# Altium PCB POD-Design-v1.0.PcbDoc (part 5 of 8)
Units mil, origin at the board's own origin, x right, y up, seen from the top; angles counter-clockwise.
Board outline 5511.81 x 3937.01 mil, 4 copper layers (Top Layer, Layer 1, Layer 2, Bottom Layer), stack 61.653 mil thick; 347 components, 252 nets, 1015 pads, 412 vias.
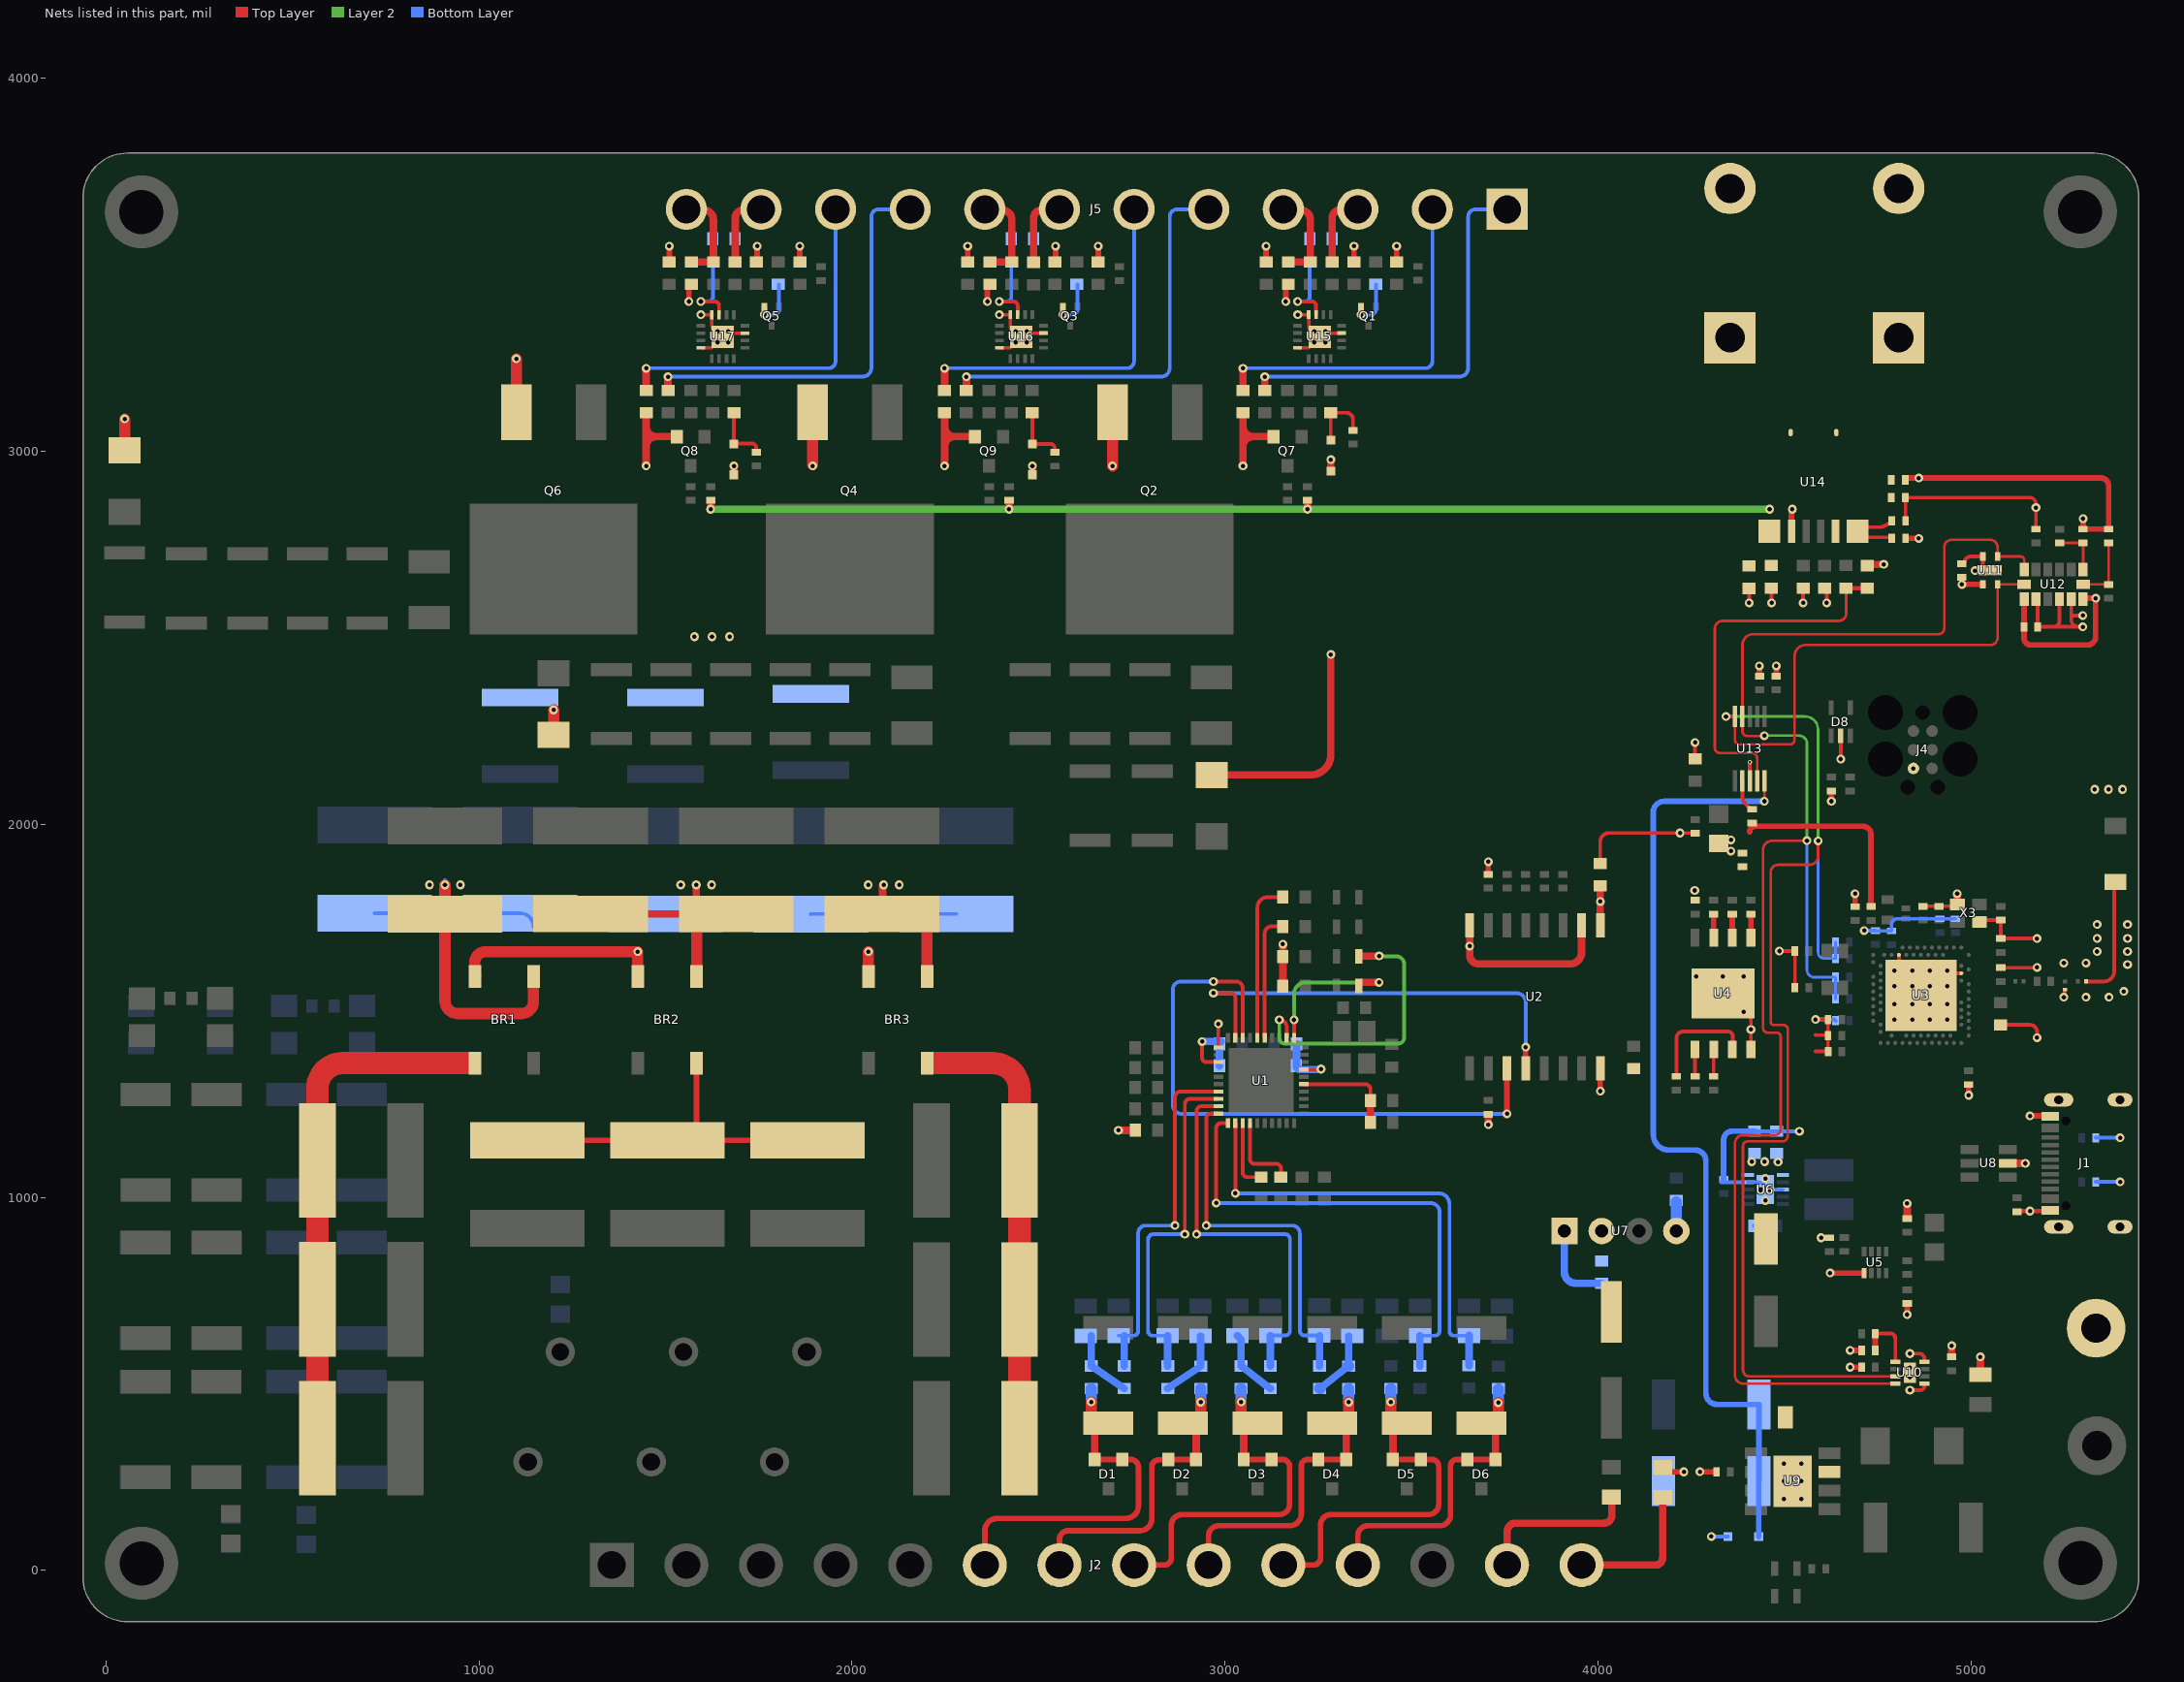
[diagram p4: the nets of this part, all layers, seen from the top]

## Part data (continued)
R110 R111 R112 R127 R128 R129 R144 R145 R146: library part CRCW201010K5FKEF, "RES SMD 10.5K OHM 1% 3/4W 2010", LCSC Part Number=C3009756, Manufacturer="Vishay Dale", Voltage Rating (DC)=400V, ComponentLink1Description=https://datasheet.ciiva.com/48526/dcrcwe3-48526619.pdf?src-supplier=Avnet, ComponentLink1URL=https://datasheet.ciiva.com/48526/dcrcwe3-48526619.pdf?src-supplier=Avnet, ComponentLink2Description=https://datasheet.ciiva.com/2476/dcrcwe3-2476773.pdf?src-supplier=Digikey, ComponentLink2URL=https://datasheet.ciiva.com/2476/dcrcwe3-2476773.pdf?src-supplier=Digikey, ComponentLink3Description=https://datasheet.ciiva.com/2476/dcrcwe3-2476774.pdf?src-supplier=Digikey, ComponentLink3URL=https://datasheet.ciiva.com/2476/dcrcwe3-2476774.pdf?src-supplier=Digikey, ComponentLink4Description=https://datasheet.ciiva.com/2476/dcrcwe3-2476775.pdf?src-supplier=Digikey, ComponentLink4URL=https://datasheet.ciiva.com/2476/dcrcwe3-2476775.pdf?src-supplier=Digikey, Item Type=Resistors, Lead Free=5697LeadFree, Manufacturer Part Number=CRCW201010K5FKEF, Pricing="1=0.22, 10=0.103, 50=0.103, 100=0.067, 1000=0.049, 10000=0.028 (USD)", RoHS=Yes, Stock=2385, Supplier=Mouser
R113 R114 R130 R131 R147 R148: library part AS101AJ0105T4E, "1.5W Thick Film Resistors 400V ±100ppm/℃ ±5% 1MΩ 2010 Chip Resistor - Surface Mount ROHS", LCSC Part Number=C965991, Manufacturer="UNI-ROYAL(Uniroyal Elec)", Package=2010, ComponentLink1Description=LCSC, ComponentLink1URL=https://www.lcsc.com/product-detail/Chip-Resistor-Surface-Mount_UNI-ROYAL-Uniroyal-Elec-AS101AJ0105T4E_C965991.html, Item Type=Resistor, Manufacturer Part Number=AS101AJ0105T4E
R149 R150 R151: library part RC0603FR-07499RL, "RES 499 OHM 1% 1/10W 0603", Case Code (Imperial)=0603, Case Code (Metric)=1608, LCSC Part Number=C137714, Manufacturer=Yageo, Max Operating Temperature=155°C, Max Power Dissipation=100mW, Min Operating Temperature=-55°C, Package Quantity=1, Resistor Type="Thick Film", Supplier Part Number 1=1995585, Temperature Coefficient=100ppm/°C, Tolerance=1%, Voltage Rating=50V, Case/Package=0603, Category="Chip SMD Resistors", ComponentLink1Description=https://datasheet.ciiva.com/11808/0900766b80f96399-11808558.pdf?src-supplier=RSComponents, ComponentLink1URL=https://datasheet.ciiva.com/11808/0900766b80f96399-11808558.pdf?src-supplier=RSComponents, ComponentLink2Description=https://datasheet.ciiva.com/2453/pyu-r-int-thick-7-2453956.pdf?src-supplier=Digi-Key, ComponentLink2URL=https://datasheet.ciiva.com/2453/pyu-r-int-thick-7-2453956.pdf?src-supplier=Digi-Key, ComponentLink3Description=https://datasheet.ciiva.com/2453/pyu-r-int-thick-7-2453957.pdf?src-supplier=Digi-Key, ComponentLink3URL=https://datasheet.ciiva.com/2453/pyu-r-int-thick-7-2453957.pdf?src-supplier=Digi-Key, ComponentLink4Description=https://datasheet.ciiva.com/2453/pyu-r-int-thick-7-2453955.pdf?src-supplier=Digi-Key, ComponentLink4URL=https://datasheet.ciiva.com/2453/pyu-r-int-thick-7-2453955.pdf?src-supplier=Digi-Key, ComponentLink5Description=https://datasheet.ciiva.com/12558/rc0603-272842-12558391.pdf?src-supplier=Mouser, ComponentLink5URL=https://datasheet.ciiva.com/12558/rc0603-272842-12558391.pdf?src-supplier=Mouser, ComponentLink6Description=https://datasheet.ciiva.com/8885/pyu-rc0603-51-rohs-l-4-8885483.pdf?src-supplier=Avnet, ComponentLink6URL=https://datasheet.ciiva.com/8885/pyu-rc0603-51-rohs-l-4-8885483.pdf?src-supplier=Avnet, Construction=Rectangular, Contact Plating=Tin,Matte, Depth=0.8mm, Features="Moisture Resistant", Height=0.45mm, Lead Free="Lead Free", Length=1.6mm, Manufacturer Part Number=RC0603FR-07499RL, Military Standard=Not, Mount="Surface Mount", Number of Terminations=2, Packaging="Tape and Reel", Power Rating=100mW, Pricing 1="5000=0.00300, 10000=0.00300, 15000=0.00300, 20000=0.00200 (GBP)", Radiation Hardening=No, Resistance=499R, RoHS=Yes, RoHS Compliant=Yes, Series=RC, Size Code=0603, Stock 1=900, Supplier 1=RSComponents, Technology="THICK FILM", Termination=SMD/SMT, Voltage Rating (DC)=50V, Width=0.031inch
RV1 RV2 RV3: "775V 385V 300V 470V Plugin Varistors ROHS", LCSC Part Number=C522648, Manufacturer=Yageo, Item Type=Varistors, Manufacturer Part Number=471KD10J, Pricing="1=0.43, 10=0.27, 50=0.27, 100=0.187, 1000=0.145, 10000=0.096 (USD)", RoHS=Yes, Stock=1519, Supplier=Mouser
SB1: "Solder Bridge ON", Manufacturer Part Number="Solder Bridge", Item Type="Solder Bridge"
TP1 TP2: "Test pad"
U1: "IC AFE 7 CHAN 40LFCSP-WQ", Manufacturer="Analog Devices", Supplier Part Number=584-ADE9000ACPZ, ComponentLink1Description=http://www.farnell.com/datasheets/2280571.pdf?src-supplier=Farnell, ComponentLink1URL=http://www.farnell.com/datasheets/2280571.pdf?src-supplier=Farnell, ComponentLink2Description=https://datasheet.octopart.com/ADE9000ACPZ-Analog-Devices-datasheet-165826959.pdf?src-supplier=Element14, ComponentLink2URL=https://datasheet.octopart.com/ADE9000ACPZ-Analog-Devices-datasheet-165826959.pdf?src-supplier=Element14, ComponentLink3Description=https://www.analog.com/media/en/technical-documentation/data-sheets/ADE9000.pdf?src-supplier=Digikey, ComponentLink3URL=https://www.analog.com/media/en/technical-documentation/data-sheets/ADE9000.pdf?src-supplier=Digikey, Item Type=IC, Manufacturer Part Number=ADE9000ACPZ, Pricing="1=18.44, 10=13.35, 50=10.79, 100=10.79, 1000=10.52, 10000=10.52 (USD)", RoHS=Yes, Stock=7889, Supplier=Mouser
U2: "DGTL ISO 5000VRMS 4CH GP 16SOIC", Case/Package=SOIC, Isolated Power=No, LCSC Part Number=C571196, Manufacturer="Texas Instruments", Max Operating Temperature=125°C, Min Operating Temperature=-55°C, Channel Type=Unidirectional, ComponentLink1Description=http://www.ti.com/lit/ds/symlink/iso7741.pdf?src-supplier=Digikey, ComponentLink1URL=http://www.ti.com/lit/ds/symlink/iso7741.pdf?src-supplier=Digikey, ComponentLink2Description=http://www.ti.com/general/docs/suppproductinfo.tsp?distId=10&amp;gotoUrl=http%3A%2F%2Fwww.ti.com%2Flit%2Fgpn%2Fiso7741&src-supplier=Digikey, ComponentLink2URL=http://www.ti.com/general/docs/suppproductinfo.tsp?distId=10&amp;gotoUrl=http%3A%2F%2Fwww.ti.com%2Flit%2Fgpn%2Fiso7741&src-supplier=Digikey, Data Rate=100Mbps, Item Type=IC, Lead Free="Lead Free", Manufacturer Part Number=ISO7741DWR, Mounting Technology="Surface Mount", Number of Channels=4, Packaging="Cut Tape", Pins=16, Pricing="1=2.32, 10=1.36, 50=1.36, 100=1.29, 1000=1.22, 10000=1.1 (USD)", Propagation Delay=16ns, Pulse Width Distortion (PWD)=4.9ns, RoHS=Yes, RoHS Compliant=Yes, Series=-, Stock=8750, Supplier=Mouser, Type="General Purpose"
U3: "IC RF TXRX+MCU 802.15.4 73QFN", Clock Frequency=2.4GHz, LCSC Part Number=C190794, Manufacturer="Nordic Semiconductor", Max Supply Voltage=5.5V, Min Supply Voltage=1.7V, ComponentLink1Description=https://datasheet.ciiva.com/67714/nrf52840-ps-v1-1-67714656.pdf?src-supplier=Digikey, ComponentLink1URL=https://datasheet.ciiva.com/67714/nrf52840-ps-v1-1-67714656.pdf?src-supplier=Digikey, Height=850um, Item Type=IC, Manufacturer Part Number=NRF52840-QIAA-R, Pricing="3000=3.3173, 6000=3.30038, 12000=3.28345, 18000=3.26653, 24000=3.2496 (USD)", RoHS=No, Stock=42000, Supplier=Avnet
U4: "IC FLASH 128MBIT SPI/QUAD 8WSON", Frequency=133MHz, LCSC Part Number=C401662, Manufacturer=Winbond, Max Operating Temperature=85°C, Min Operating Temperature=-40°C, ComponentLink1Description=http://www.winbond.com/resource-files/w25q128jv%20revf%2003272018%20plus.pdf?src-supplier=Digikey, ComponentLink1URL=http://www.winbond.com/resource-files/w25q128jv%20revf%2003272018%20plus.pdf?src-supplier=Digikey, Item Type=IC, Manufacturer Part Number=W25Q128JVEIQ, Memory Format=Non-Volatile,FLASH, Memory Size=128Mb, Mounting Technology="Surface Mount", Packaging=Rail/Tube, Pricing="1=1.92, 10=1.701, 25=1.6224, 63=1.54651, 126=1.49183, 252=1.43909, 504=1.38821, 1008=1.33908, 5040=1.23141 (USD)", RoHS=Yes, RoHS Compliant=Yes, Series=SpiFlash®, Stock=12733, Supplier=Digikey
U5: "1.6-V TO 5.5-V, 20-M, 4-A LOW IQ", Manufacturer="Texas Instruments", Supplier Part Number=595-TPS2117DRLR, Height=600um, Item Type=IC, Length=2.1mm, Manufacturer Part Number=TPS2117DRLR, Pins=8, Pricing="1=1.34, 10=1.2, 50=1.2, 100=0.938, 1000=0.612, 10000=0.522 (USD)", RoHS=No, Stock=3415, Supplier=Mouser, Thickness=550um, Width=1.2mm
U6: "IC REG BUCK BST 3.3V 900MA 10SON", LCSC Part Number=C15516, Manufacturer="Texas Instruments", ComponentLink1Description=https://datasheet.ciiva.com/2034/tps63030-2034702.pdf?src-supplier=Digikey, ComponentLink1URL=https://datasheet.ciiva.com/2034/tps63030-2034702.pdf?src-supplier=Digikey, ComponentLink2Description=https://datasheet.ciiva.com/3221/tps63030-3221513.pdf?src-supplier=Avnet, ComponentLink2URL=https://datasheet.ciiva.com/3221/tps63030-3221513.pdf?src-supplier=Avnet, Item Type=IC, Manufacturer Part Number=TPS63031DSKR, Pricing="1=2.33, 10=1.64, 50=1.64, 100=1.35, 1000=0.965, 10000=0.917 (USD)", RoHS=Yes, Stock=43441, Supplier=Mouser
U7: "Plugin Isolated Power Modules ROHS", LCSC Part Number=C2992399, Manufacturer=YLPTEC, Package=Plugin, ComponentLink1Description=LCSC, ComponentLink1URL=https://www.lcsc.com/product-detail/Isolated-Power-Modules_YLPTEC-B0303S-1WR2_C2992399.html, Item Type="Power Module", Manufacturer Part Number=B0303S-1WR2
U8: "6A 12V 150W 6V Unidirectional 5V SOT-23-6 ESD and Surge Protection (TVS/ESD) ROHS", LCSC Part Number=C2827654, Manufacturer="TECH PUBLIC", Package=SOT-23-6, ComponentLink1Description=LCSC, ComponentLink1URL=https://www.lcsc.com/product-detail/ESD-and-Surge-Protection-TVS-ESD_TECH-PUBLIC-USBLC6-2SC6_C2827654.html, Item Type=(TVS/ESD), Manufacturer Part Number=USBLC6-2SC6
U9: "4V~6V Polymer 1 3.5A SOP-8-EP Battery Management ICs ROHS", LCSC Part Number=C130316, Manufacturer=SOLA-IC, Package=SOP-8-EP, ComponentLink1Description=LCSC, ComponentLink1URL=https://www.lcsc.com/product-detail/Battery-Management-ICs_SOLA-IC-SLM6600_C130316.html, Item Type=IC, Manufacturer Part Number=SLM6600
U10: "IC BATT MON LI-ION 1CELL 8TDFN", LCSC Part Number=C2682616, Manufacturer=Maxim, Max Operating Temperature=85°C, Min Operating Temperature=-20°C, Operating Supply Current=23uA, Operating Supply Voltage=4.5V, Output Voltage=400mV, Package Quantity=10000, Supplier Part Number 1=700-MAX17048G+T10, Category="Battery Management", ComponentLink1Description=https://datasheet.ciiva.com/14083/max17048-max17049-14083973.pdf?src-supplier=Digi-Key, ComponentLink1URL=https://datasheet.ciiva.com/14083/max17048-max17049-14083973.pdf?src-supplier=Digi-Key, Contact Plating=Tin,Matte, Item Type=IC, Manufacturer Part Number=MAX17048G+T10, Mount="Surface Mount", Number of Pins=8, Packaging="Tape and Reel", Pricing 1="1=3.34000, 10=3.00000, 50=2.84000, 100=2.46000, 1000=1.89000, 10000=1.83000 (USD)", Radiation Hardening=No, RoHS=Yes, RoHS Compliant=Yes, Series=ModelGauge™, Stock 1=41293, Supplier 1=Mouser
U11: "SHTC3 Series Digital ±2% RH SMT Humidity Temperature Sensor - DFN-8", LCSC Part Number=C194656, Manufacturer=Sensirion, ComponentLink1Description=https://datasheet.octopart.com/SHTC3-TR-2.5KS-Sensirion-datasheet-166628637.pdf?src-supplier=Future+Electronics, ComponentLink1URL=https://datasheet.octopart.com/SHTC3-TR-2.5KS-Sensirion-datasheet-166628637.pdf?src-supplier=Future+Electronics, Item Type=IC, Manufacturer Part Number=SHTC3-TR-2.5KS, Pricing="1=2.72, 5=2.292, 10=2.129, 25=1.932, 50=1.7952, 100=1.6682, 500=1.40712, 1000=1.30776 (USD)", RoHS=No, Stock=21685, Supplier=Digikey
U12: "ACCEL 2-16G I2C/SPI 14LGA", LCSC Part Number=C9667, Manufacturer="Analog Devices", ComponentLink1Description=https://datasheet.ciiva.com/15099/getdatasheetpartid-317342-15099703.pdf?src-supplier=Verical, ComponentLink1URL=https://datasheet.ciiva.com/15099/getdatasheetpartid-317342-15099703.pdf?src-supplier=Verical, ComponentLink2Description=https://datasheet.ciiva.com/3271/adxl345-ep-3271528.pdf?src-supplier=Avnet, ComponentLink2URL=https://datasheet.ciiva.com/3271/adxl345-ep-3271528.pdf?src-supplier=Avnet, ComponentLink3Description=https://datasheet.ciiva.com/2809/adxl345-2809853.pdf?src-supplier=Digikey, ComponentLink3URL=https://datasheet.ciiva.com/2809/adxl345-2809853.pdf?src-supplier=Digikey, ComponentLink4Description=https://datasheet.ciiva.com/2809/adxl345-2809854.pdf?src-supplier=Digikey, ComponentLink4URL=https://datasheet.ciiva.com/2809/adxl345-2809854.pdf?src-supplier=Digikey, ComponentLink5Description=https://datasheet.ciiva.com/2809/adxl345-2809855.pdf?src-supplier=Digikey, ComponentLink5URL=https://datasheet.ciiva.com/2809/adxl345-2809855.pdf?src-supplier=Digikey, ComponentLink6Description=https://datasheet.ciiva.com/3271/adxl345-ep-3271595.pdf?src-supplier=Avnet, ComponentLink6URL=https://datasheet.ciiva.com/3271/adxl345-ep-3271595.pdf?src-supplier=Avnet, Item Type=Accelerometers, Manufacturer Part Number=ADXL345BCCZ-RL7, Pricing="1=6.67, 10=5.76, 50=5.27, 100=5.09, 1000=4.59, 10000=4.59 (USD)", RoHS=Yes, Stock=17836, Supplier=Mouser
U13: "IC ADC 16BIT SIGMA-DELTA 10VSSOP", Case/Package=VSSOP, LCSC Part Number=C37593, Manufacturer="Texas Instruments", Max Operating Temperature=125°C, Max Supply Voltage=5.5V, Min Operating Temperature=-40°C, Min Supply Voltage=2V, Nominal Supply Current=150uA, Package Quantity=2500, Power Dissipation=900uW, Supplier Part Number=595-ADS1115IDGSR, Category="Analog to Digital Converters (ADCs)", ComponentLink1Description=https://datasheet.ciiva.com/4031/47725463s8438921n7713-4031028.pdf?src-supplier=Arrow+Electronics, ComponentLink1URL=https://datasheet.ciiva.com/4031/47725463s8438921n7713-4031028.pdf?src-supplier=Arrow+Electronics, Contact Plating=Gold, Conversion Rate=0.86KS/s, Height=1.07mm, Integral Nonlinearity (INL)=1LSB, Interface=I2C, Item Type=IC, Lead Free="Lead Free", Length=3mm, Manufacturer Part Number=ADS1115IDGSR, Max Supply Voltage (DC)=5.5V, Min Supply Voltage (DC)=2V, Number of A/D Converters=1, Number of Bits=16, Number of Channels=2, Number of Converters=1, Number of Inputs=4, Packaging="Tape and Reel", Pins=10, Polarity=Bipolar, Pricing="1=5.44, 10=4.76, 50=4.76, 100=4.01, 1000=2.88, 10000=2.78 (USD)", Reach SVHC Compliant=No, Resolution=16b, RoHS=Yes, RoHS Compliant=Yes, Sampling Rate=860S/s, Series=-, Stock=5925, Supplier=Mouser, Supply Type=Single, Thickness=1.02mm, Width=3mm
U14: "POSITION&CURRENT SENSORS", LCSC Part Number=C540236, Manufacturer=Infineon, Max Supply Voltage=3.5V, Min Supply Voltage=3.1V, Operating Supply Current=15mA, Accuracy=2.25%, Height=1.1mm, Item Type="Current Sensors", Manufacturer Part Number=TLI4971-A120T5-U-E0001, Pricing="2500=2.753 (USD)", RoHS=Yes, Sensing Method=6244SensingMethod, Stock=5000, Supplier="Arrow Electronics"
U15 U16 U17: "IC GRND FAULT CIRC INTER 16-VQFN", LCSC Part Number=C17533396, Manufacturer="Texas Instruments", Item Type=IC, Manufacturer Part Number=AFE3010AIRGTR, Pricing="1=1.66, 10=1.61, 50=1.61, 100=1.61, 1000=1.23, 10000=0.749 (USD)", RoHS=Yes, Stock=1960, Supplier=Mouser
X1: library part X322524576MOB4SI, "24.576MHz Surface Mount Crystal 12pF ±10ppm ±20ppm SMD3225-4P Crystals ROHS", LCSC Part Number=C70568, Manufacturer=YXC, ComponentLink1Description=LCSC, ComponentLink1URL=https://www.lcsc.com/product-detail/Crystals_YXC-Crystal-Oscillators-X322524576MOB4SI_C70568.html?s_z=n_X322524576MOB4SI, Item Type=Crystal, Manufacturer Part Number=X322524576MOB4SI, RoHS=No, Supplier=LCSC
X2: library part Q13FC13500049, "Crystal, 32.768KHZ, 6PF, 3.2MM X 1.5MM Rohs Compliant: Yes", LCSC Part Number=C95361, Manufacturer=Epson, Item Type=Crystal, Manufacturer Part Number=Q13FC13500049, Pricing="100=5.52, 250=5.41 (DKK)", RoHS=No, Stock=760, Supplier=Farnell
X3: library part Q22FA12800025, "CRYSTAL 32.0000MHZ 8PF SMD", LCSC Part Number=C187794, Manufacturer=Epson, ComponentLink1Description=http://ndap3-net.ebz.epson.co.jp/w/www/PDFS/epdoc_qd.nsf/85a4e2c523a1f89349257068002f9e30/255cb2884010a1f9492571f0004c7d72/$FILE/FA-128_E09X.pdf?src-supplier=Newark, ComponentLink1URL=http://ndap3-net.ebz.epson.co.jp/w/www/PDFS/epdoc_qd.nsf/85a4e2c523a1f89349257068002f9e30/255cb2884010a1f9492571f0004c7d72/$FILE/FA-128_E09X.pdf?src-supplier=Newark, ComponentLink2Description=http://www.farnell.com/datasheets/1734615.pdf?src-supplier=Newark, ComponentLink2URL=http://www.farnell.com/datasheets/1734615.pdf?src-supplier=Newark, Item Type=Crystal, Manufacturer Part Number=Q22FA12800025, Pricing="250=0.511 (GBP)", RoHS=Yes, Stock=250, Supplier=Farnell

## Free pads (board coordinates)
  round 196.85 hole 118.11: MH(95.31,3641.74) MH(95.67,19.32) MH(5292.52,3642.09) MH(5292.88,19.68)

## Via types
v1: diameter 23.62, hole 11.81, Top Layer to Bottom Layer, tented both sides, 381 vias
v2: diameter 11.81, hole 5.91, Top Layer to Bottom Layer, tented both sides, 30 vias
v3: diameter 15.75, hole 5.91, Top Layer to Bottom Layer, tented both sides, 1 vias

## Nets (pads, with @x,y where several pads share a name; then routed paths per layer and width w, separated by ;. In a path a pad name is that pad's centre, name@x,y a point inside that pad or via, vN(x,y) a via of type N, cw(c..) or ccw(c..) an arc to the next point about the centre after c; other vN are vias at no path point)
3V3: C15.2 C57.2 C58.2 C61.2 C67.2 C68.1 C71.2 C73.2 C74.2 FB6.2 R21.1 R54.1 R67.2 R76.1 R78.2 R79.2 R82.2 R89.1 R90.1 R155.1 R157.1 R159.1 U2.1 U6.1 U6.10 U7.2 U11.1 U12.1 U12.6 U14.1 | length 4970
  Top Layer w15: R21.1@3705.93,1865.94 v1(3705.93,1900) ; 4406.71,1980 cw(c4421.64,1980) 4421.64,1994.93 4709.9,1994.93 cw(c4709.9,1973.17) 4731.66,1973.17 R54.1@4731.66,1779.82 ; v1(4597.95,891.9) R67.2@4620.63,891.91 ; v1(4676,590) R76.1@4706.38,590 ; R90.1@4823.42,2928.65 v1(4859.92,2928.65) ; R89.1@4824.42,2766.69 v1(4859.96,2766.69) ; v1@4860.6,2928.65 5347.79,2928.65 cw(c5347.79,2907.63) 5368.81,2907.63 R79.2@5368.81,2791.64 R78.2@5300.39,2791.64 v1@5300.39,2819.56 ; C67.2@4975.32,2662.25 v1(4975.32,2643.35) U11.1@5031.63,2643.35 ; U12.1@5141.74,2602.8 C68.1@5141.74,2529.64 5141.74,2500.26 ccw(c5161,2500.26) 5161,2481 5311.7,2481 ccw(c5311.7,2503.33) 5334.03,2503.33 v1(5334.03,2606.35) ; U12.6@5300,2603.58 5302.76,2606.35 v1@5333.82,2606.35
  Top Layer w20: v1(1621,2845) 1621.08,2845 R157.1@1621.08,2866.09 ; v1(2421.08,2845) R159.1@2421.08,2865.12 ; v1@3221.08,2845 R155.1@3221.08,2865.8 ; U2.1@4005.93,1729.37 v1(4005.93,1793.48) C15.2@4005.93,1835.44
  Layer 2 w20: v1(1621,2845) v1(2421.08,2845) v1(3220.96,2845) v1(4459.96,2845)
  other v1: 4482.77,1094.86 4412.27,1096.06 4446.77,1096.06 4356.06,1928.61 4356.06,1958.61 5300.35,2819.56
3V3-IS: C16.2 C24.2 C25.2 C62.2 R22.2 R23.1 R28.2 R29.2 U1.1 U1.27 U2.16 U7.4 | length 563.2
  Top Layer w10: U1.1@2982.03,1402.08 v1(2982.03,1465.59) ; U1.27@3210.97,1343.03 v1@3257.25,1343.03 ; v1@4005,1285 ccw(c4005,1285.93) v1@4005.93,1285.93
  Top Layer w15: v1@4005.93,1285.93 U2.16@4005.93,1345.51
  Top Layer w20: v1(2714.35,1180) R23.1@2760,1180 ; R28.2@3155.19,1566.75 R29.2@3155.19,1646.16 v1(3155.19,1679.19) ; v1(3705.93,1195) R22.2@3705.93,1220.5
  Bottom Layer w20: C25.2@3191.71,1411.9 3191.71,1353.05 C24.2@3191.36,1352.71 ccw(c3201.04,1352.71) 3201.04,1343.03 v1@3257.25,1343.03
  Bottom Layer w30: U7.4@4210,910 C62.2@4210,988.05
  other v1: 4005.93,1285 3257.25,1344.2
ACCEL_CS: R64.2 R79.1 U12.7 | length 179.7
  Top Layer w7: U12.7@5300.39,2643.35 R64.2@5368.81,2643.35 R79.1@5368.81,2754.64
ACCEL_INT: R63.2 R78.1 U12.8 | length 134.8
  Top Layer w7: R63.2@5237.75,2754.44 5237.75,2754.64 R78.1@5300.39,2754.64 5300.39,2683.11 U12.8@5300,2683.11
ALARM-1: D12.2 R92.2 R108.1 | length 172.1
  Top Layer w10: R108.1@3283.48,3103.47 R108.1@3283.48,3103.47 ; D12.2@3283.54,3029.95 R108.1@3283.48,3103.47 ; R92.2@3343,3056.62 3343,3085.27 ccw(c3324.8,3085.27) 3324.8,3103.47 R108.1@3283.48,3103.47
ALARM-2: D14.2 R93.2 R125.1 | length 152.1
  Top Layer w10: R125.1@2483.48,3103.47 R125.1@2483.48,3103.47 D14.2@2483.54,3029.95 ; D14.2@2483.54,3019.95 2532.3,3019.95 cw(c2532.3,3009.26) 2542.97,3010.01 ; 2543,3009.26 ccw(c2532.3,3009.26) 2542.97,3010.01 ; R93.2@2543.71,2997.51 cw(c2543.71,2998.25) 2542.97,2998.25 2542.97,3010.01
ALARM-3: D13.2 R94.2 R142.1 | length 162
  Top Layer w10: R142.1@1683.48,3103.47 1683.54,3020.8 1732.3,3020.8 cw(c1732.3,3010.1) 1743,3010.1 R94.2@1743,2996.32
ALRT_RDY: R82.1 U13.2 | length 87.1
  Top Layer w10: U13.2@4387.02,2116.14 4387.02,2076.84 ccw(c4421.17,2076.84) 4397,2052.72 4405.03,2044.69 4409.02,2044.69 R82.1@4413.02,2040.69
AVDD1: C20.2 C21.2 U1.25 | length 276
  Top Layer w10: U1.25@3210.97,1303.66 3375.82,1303.66 cw(c3375.82,1289.49) 3390,1289.49 C20.2@3390,1260
  Top Layer w20: C21.2@3389.99,1200.65 C20.2@3390,1260
BAT_ALERT: R62.2 R76.2 U10.5 | length 168.8
  Top Layer w10: R62.2@4743.38,635 4743.38,635.46 4783.23,635.46 cw(c4783.23,621.65) 4797.05,621.65 U10.5@4797.05,559.83
  Top Layer w15: R76.2@4743.38,590 R62.2@4743.38,635
CF3_1: R26.2 U1.35 | length 339.4
  Top Layer w10: U1.35@3106.34,1427.97 3106.34,1707.67 cw(c3125.41,1707.67) 3125.41,1726.75 R26.2@3155.19,1726.75
CF4_1: R27.2 U1.36 | length 433.4
  Top Layer w10: U1.36@3086.66,1427.97 3086.66,1776.66 cw(c3115,1776.66) 3115,1805 R27.2@3155.19,1804.99
DC_CUR: C76.2 R88.1 U13.4 | length 1009.1
  Top Layer w7: U13.4@4426.39,2116.14 4426.39,2177.36 ccw(c4412.61,2177.36) 4412.61,2191.14 4327.86,2191.14 cw(c4327.86,2206) 4313,2206 4313,2523.82 cw(c4334.75,2523.82) 4334.75,2545.56 4644.91,2545.56 ccw(c4644.91,2566.01) 4665.36,2566.01 R88.1@4665.36,2633.57
  Top Layer w12: R88.1@4665.36,2633.57 4668.17,2633.57 C76.2@4721.68,2633.57
DC_CUR_NEG: J8.1 U14.7
DC_CUR_POS: J7.1 U14.8
DC_OCD1: C78.2 R89.2 U14.6 | length 200.3
  Top Layer w10: 4753.09,2796.86 4720.23,2796.86 U14.6@4695.7,2785.6 ccw(c4711.6,2785.6) 4711.6,2769.69 R89.2@4786.42,2769.69 ; 4753.13,2796.86 ccw(c4753.13,2834.16) 4776.05,2804.73 4782.42,2809.68 C78.2@4786.08,2816.67
DC_OCD2: C79.2 R90.2 U14.5
DC_VOLTS: D7.2 R85.1 R86.2 U13.5 | length 2549.6
  Top Layer w7: v1@4445,2062 ccw(c4445,2063.08) 4446.08,2063.08 U13.5@4446.08,2116.14
  Bottom Layer w15: D7.2@4430.63,91.22 R86.2@4430.63,239.22 ; R86.2@4431.27,240.07 R85.1@4431.27,445.13 4319.75,445.13 cw(c4319.75,475.88) 4289,475.88 4289,1098.21 ccw(c4260,1098.21) 4260,1127.21 4189.79,1127.21 cw(c4189.79,1169) 4148,1169 4148,2032 cw(c4178,2032) 4178,2062 v1(4446.08,2062)
DC_VOLTS_NEG: J2.14 R87.1 | length 390.3
  Top Layer w20: J2.14@3956.1,14.82 4154.05,14.82 ccw(c4154.05,34) 4173.23,34 R87.1@4173.23,196.22
DC_VOLTS_POS: J2.13 R84.1 | length 445
  Top Layer w20: J2.13@3756.1,14.82 3756.1,103.73 cw(c3779.37,103.73) 3779.37,127 4016.37,127 ccw(c4016.37,147.63) 4037,147.63 4037,195.28 ccw(c4035.43,195.28) R84.1@4035.43,196.85
DVDD1: C18.2 C19.2 U1.3 | length 209.2
  Top Layer w10: v1(2938.72,1417.88) 2938.72,1373.83 ccw(c2949.84,1373.83) 2949.84,1362.71 U1.3@2982.03,1362.71
  Bottom Layer w20: v1(2938.72,1417.88) C19.2@2989.24,1417.88 ; C19.2@2981.24,1407.88 ccw(c2981.24,1411.77) C19.2@2985.12,1411.58 ; C18.2@2985.12,1352.72 C19.2@2985.12,1411.58 ; C19.2@2985.12,1411.77 cw(c2981.24,1411.77) C19.2@2985.12,1411.58
FLASH_CLK: R49.2 U4.6 | length 63.5
  Top Layer w15: U4.6@4359.99,1696.16 R49.2@4359.99,1759.64
FLASH_CS: R48.2 U4.1 | length 72.3
  Top Layer w10: R48.2@4260,1324.64 U4.1@4259.99,1396.95
FLASH_QSPI0: R50.2 U4.5 | length 63.5
  Top Layer w15: U4.5@4409.99,1696.16 R50.2@4409.99,1759.64
FLASH_QSPI1: R51.2 U4.2 | length 72.3
  Top Layer w10: R51.2@4309.99,1324.64 U4.2@4309.99,1396.96
FLASH_QSPI2: R52.2 U4.3 | length 306.4
  Top Layer w10: R52.2@4210.01,1324.64 4210.01,1426.17 cw(c4228.54,1426.17) 4228.54,1444.7 4347.9,1444.7 cw(c4347.9,1431.11) 4361.49,1431.11 4361.49,1398.46 cw(c4359.99,1398.46) U4.3@4359.99,1396.96
FLASH_QSPI3: R53.2 U4.7 | length 63.5
  Top Layer w15: U4.7@4309.99,1696.16 R53.2@4309.99,1759.64
GND: BR1.2 BR2.2 BR3.2 C15.1 C35.1 C36.1 C37.2 C38.1 C39.1 C40.1 C41.1 C42.2 C43.1 C44.2 C46.1 C47.1 C48.1 C49.1 C50.1 C51.1 C52.1 C53.1 C54.1 C55.1 C56.2 C57.1 C58.1 C59.1 C60.1 C61.1 C63.2 C64.2 C65.1 C66.1 C67.1 C68.2 C69.1 C70.1 C71.1 C72.2 C73.1 C74.1 C75.1 C76.1 C77.1 C78.1 C79.1 C81.1 C82.1 C84.1 C86.1 C87.1 C88.1 C90.1 C91.1 C93.1 C95.1 C96.1 C97.1 C99.1 C100.1 C102.1 C104.1 C105.1 C106.1 C107.2 C108.2 C109.2 D7.1 D8.2 D12.1 D13.1 D14.1 J1.A1/B12 J1.B1/A12 J1.S1 J1.S2 J1.S3 J1.S4 J4.5 L5.1 Q1.2 Q2.3 Q3.2 Q4.3 Q5.2 Q6.3 Q7.2 Q8.2 Q9.2 R69.1 R70.1 R71.2 R72.2 R75.1 R77.1 R80.1 R81.1 R83.1 R86.1 R87.2 R107.1 R124.1 R141.1 TP2.1 U2.2 U2.8 U3.74 U3.B7 U3.F23 U4.4 U4.9 U5.1 U6.3 U6.9 U6.11 U7.1 U8.2 U9.7 U9.9 U10.1 U10.4 U10.9 U11.4 U11.5 U12.2 U12.4 U12.5 U13.3 U14.2 U15.4 U15.11 U15.16 U15.17 U16.4 U16.11 U16.16 U16.17 U17.4 U17.11 U17.16 U17.17 X3.2 X3.4 | length 9792.3
  Top Layer w6: U3.F23@4973.76,1601.08 U3.F23@4973.88,1601.2
  Top Layer w9: U17.4@1594.88,3277.51 U17.17@1624.5,3277.51 ; U17.16@1624.49,3366.15 1624.49,3336.53 ccw(c1653.93,3336.53) U17.17@1653.93,3307.09 ; U17.11@1712.99,3316.94 U17.17@1663.78,3316.94 ; U16.4@2394.88,3277.51 2424.5,3277.51 ; U16.16@2424.49,3366.15 2424.49,3336.53 ccw(c2453.93,3336.53) U16.17@2453.93,3307.09 ; U16.11@2512.99,3316.94 U16.17@2463.78,3316.94 ; U15.4@3194.88,3277.51 3224.5,3277.51 ; U15.16@3224.49,3366.15 3224.49,3336.53 ccw(c3253.93,3336.53) U15.17@3253.93,3307.09 ; U15.11@3312.99,3316.94 U15.17@3263.78,3316.94 ; v1@4518.54,2845 v1@4518.63,2845 ; C78.1@4824.42,2814.18 4824.42,2875.16 ccw(c4823.42,2875.16) C79.1@4823.42,2876.16 5156.72,2876.16 cw(c5156.72,2858.87) 5174.02,2858.87 v1(5173.97,2848.94) ; J1.A1/B12@5209.99,963.02 J1.A1/B12@5212.5,965.52 ; J1.B1/A12@5210.5,1215.5 ccw(c5210.5,1217.49) J1.B1/A12@5212.5,1217.49 ; U12.5@5268.5,2603.58 5268.5,2549.13 ccw(c5287.09,2549.13) 5287.09,2530.54 5299.49,2530.54 v1@5300.39,2529.64 ; U17.17@1653.93,3307.09 cw(c1663.78,3307.09) U17.17@1663.78,3316.94 ; U17.17@1653.93,3307.09 U17.17@1663.78,3316.94 ; U16.17@2453.93,3307.09 cw(c2463.78,3307.09) U16.17@2463.78,3316.94 ; U16.17@2453.93,3307.09 U16.17@2463.78,3316.94 ; U15.17@3253.93,3307.09 cw(c3263.78,3307.09) U15.17@3263.78,3316.94 ; U15.17@3253.93,3307.09 U15.17@3263.78,3316.94
  Top Layer w10: C99.1@1562.88,3440.58 C99.1@1569.68,3447.39 ; v1(1594.88,3366.14) U17.16@1624.49,3366.15 ; C90.1@2362.88,3440.58 C90.1@2369.68,3447.39 ; v1(2394.88,3366.14) U16.16@2424.49,3366.15 ; C81.1@3162.88,3440.58 C81.1@3169.68,3447.39 ; v1(3194.88,3366.14) U15.16@3224.49,3366.15 ; C15.1@4005.93,1895.44 4005.93,1953.83 cw(c4029.1,1953.83) 4029.1,1977 v1(4220,1977) 4259.19,1977 C69.1@4260,1976.19 ; R87.2@4173.23,276.22 R87.2@4185.04,264.41 ; C70.1@4260.01,2176.14 v1(4260.01,2219.45) ; v1@4273,264.41 v1(4273,264.92) ; U4.9@4335,1546.57 cw(c4335,1471.58) 4409.99,1471.58 v1(4409.99,1450.15) U4.4@4409.99,1396.95 ; v1(4405,2594) C73.1@4405.01,2632.52 ; U13.3@4406.71,2116.14 v2@4406.71,2166.73 ; R83.1@4432.3,2397.69 R83.1@4433.01,2397.69 ; C74.1@4465.01,2633.62 4465.33,2633.62 v1(4465.33,2594) ; v1@4477.83,2425 v1(4478,2425) ; v1(4486.03,1660.57) C40.1@4528,1660.57 C41.1@4528,1562.14 ; v1(4549.67,2594) C75.1@4549.67,2633.59 ; 4582.57,1436.25 4583.67,1435.15 4615.23,1435.15 C51.1@4616.5,1433.87 ; v1(4583,1477.07) C50.1@4616.5,1477.07 C54.1@4616.5,1391.38 ; 4583.27,1391.38 C54.1@4616.5,1391.38 ; C77.1@4607.98,2633.58 cw(c4607.98,2628.52) 4613.04,2628.52 v1(4613.04,2594) ; C54.1@4616.77,1391.38 C54.1@4616.5,1391.38 ; v1(4650.61,2175.13) D8.2@4650.61,2237.73 ; C76.1@4721.68,2693.57 cw(c4725.11,2693.57) C76.1@4725.11,2697 ; U3.74@4806.56,1629.96 U3.B7@4806.56,1650.41 ; v1(4836.02,483.53) 4863.56,483.53 ccw(c4863.56,494.98) 4875,494.98 U10.1@4875,500.78 ; v1(4836.02,581.5) 4861.22,581.5 cw(c4861.22,567.72) 4875,567.72 U10.4@4875,559.83 ; C35.1@4871.63,1780.63 C47.1@4914,1780.63 X3.2@4963.47,1780.63 ; U3.74@4953.31,1601.08 U3.F23@4973.76,1601.08 ; X3.2@4962.72,1786.49 X3.2@4963.47,1785.74 ; v1(4962.72,1814.39) v1@4962.72,1816.44 ; C67.1@4975.32,2699.25 C67.1@4975.32,2700.05 ; C67.1@4981.78,2700.05 cw(c4999.88,2700.05) 4999.88,2718.15 U11.4@5031.63,2718.15 U11.5@5031.63,2681.37 ; C55.1@4993,1302.5 C55.1@4993.27,1302.23 ; v1@4993.27,1274.34 v1(4993.53,1274.07) ; X3.4@5027.16,1743.63 C46.1@5079.63,1743.63 C42.2@5079.62,1694.01 v1(5176.99,1694.01) ; U11.5@5051.32,2680.25 U11.5@5051.32,2680.75 ; C49.1@5079.61,1462.76 5157.53,1462.76 cw(c5157.53,1443.3) 5176.99,1443.3 v1(5176.99,1428.46) ; C48.1@5079.61,1615.87 5176.99,1615.87 v1(5176.99,1616.45) ; U12.2@5174.02,2603.58 cw(c5174.02,2598.86) 5178.74,2598.86 C68.2@5178.74,2529.64 5221.26,2529.64 ; R80.1@5174.02,2791.64 v1(5173.97,2848.94) ; U12.4@5237.01,2603.58 5237.01,2545.39 cw(c5221.26,2545.39) 5221.26,2529.64 ; v1(5248.61,1536.66) 5250.58,1538.64 5250.58,1557.14 5250.66,1557.22 L5.1@5251.49,1557.22 ; 5270.34,2560 v1(5299.49,2560) ; v1@5300.39,2529.64 v1(5299.49,2529.64) 5221.26,2529.64
  Top Layer w12: C63.2@5122.59,963.02 J1.A1/B12@5209.99,963.02
  Top Layer w15: C102.1@1510.16,3507.4 v1@1510.16,3550.02 ; v1(1562.88,3401.74) C99.1@1562.88,3440.58 ; C108.2@1745.71,3507.38 v1(1745.66,3550) ; v1@1765.07,3364.99 v1(1765.07,3366.14) Q5.2@1765.07,3387.4 ; C105.1@1860,3507.41 v1(1859.96,3550) ; C93.1@2310.16,3507.4 v1@2310.16,3550.02 ; v1(2362.88,3401.74) C90.1@2362.88,3440.58 ; C109.2@2545.71,3507.38 v1(2545.66,3550) ; v1@2565.07,3364.99 v1(2565.07,3366.14) Q3.2@2565.07,3387.4 ; C96.1@2660,3507.4 v1(2659.96,3550) ; C84.1@3110.16,3507.4 v1@3110.16,3550.02 ; v1(3162.88,3401.74) C81.1@3162.88,3440.58 ; C107.2@3345.71,3507.38 v1(3345.66,3550) ; v1@3365.07,3364.99 v1(3365.07,3366.14) Q1.2@3365.07,3387.4 ; C87.1@3460,3507.4 v1(3459.96,3550) ; R87.2@4185.04,264.41 v1(4230,264.41) ; v1@4273,264.41 R75.1@4317.64,264.41 ; R83.1@4432.3,2397.69 v1(4432.3,2425) ; R81.1@4477.83,2397.69 v1@4477.83,2425 ; U14.2@4518.54,2785.6 v1@4518.54,2845 ; v1(4621.87,797.3) U5.1@4712.28,797.3 ; v1(4625.62,2062) C38.1@4625.62,2089.62 ; v1(4676,545.15) R77.1@4706.38,545.15 ; C43.1@4689,1779.5 v1(4689,1814.39) ; v1(4828.82,686) R69.1@4828.82,715.74 ; v1@4993.27,1274.34 C55.1@4993.27,1302.23 ; v1(5158,1218.5) J1.B1/A12@5210.5,1218.5
  Top Layer w20: v1(1448.18,2960.9) 1448.18,3012.66 ; R141.1@1448.18,3102.95 1448.18,3066.63 ; Q8.2@1530.14,3039.64 1475.17,3039.64 ; D13.1@1683.54,2937.28 v1(1683.54,2960.9) ; v1(2248.18,2960.9) 2248.18,3012.66 ; R124.1@2248.18,3102.95 2248.18,3066.63 ; Q9.2@2330.14,3039.64 2275.17,3039.64 ; D14.1@2483.54,2937.28 v1(2483.54,2960.9) ; C88.1@2964.21,2132.58 3229.08,2132.58 ccw(c3229.08,2187.04) 3283.54,2187.04 v1(3283.54,2455.58) ; v1(3048.18,2960.9) 3048.18,3012.66 ; R107.1@3048.18,3102.95 3048.18,3066.63 ; Q7.2@3130.14,3039.64 3075.17,3039.64 ; D12.1@3283.54,2947.28 v1(3283.54,2977.82) ; U2.8@3655.93,1729.37 v1(3655.93,1673.93) 3655.93,1650.42 ccw(c3680.36,1650.42) 3680.36,1626 3925,1626 ccw(c3925,1656.93) 3955.93,1656.93 U2.2@3955.93,1729.37 ; C76.1@4725.11,2697 v1(4766,2697) ; R70.1@4828.83,948.08 v1(4828.83,984) ; C66.1@4948.05,574.7 v1(4948.05,602.5) ; X3.2@4962.72,1786.49 v1(4962.72,1814.39) ; v1(5010.32,2680.25) U11.5@5051.32,2680.25 ; C65.1@5025,525 v1(5025,572.5) ; U8.2@5098.57,1091.5 v1(5145.44,1091.43) ; 1448.18,3012.66 cw(c1475.17,3012.66) 1475.17,3039.64 ; 1448.18,3012.66 1448.18,3066.63 ; 1448.18,3066.63 ccw(c1475.17,3066.63) 1475.17,3039.64 ; 2248.18,3012.66 cw(c2275.17,3012.66) 2275.17,3039.64 ; 2248.18,3012.66 2248.18,3066.63 ; 2248.18,3066.63 ccw(c2275.17,3066.63) 2275.17,3039.64 ; 3048.18,3012.66 cw(c3075.17,3012.66) 3075.17,3039.64 ; 3048.18,3012.66 3048.18,3066.63 ; 3048.18,3066.63 ccw(c3075.17,3066.63) 3075.17,3039.64
  Top Layer w30: C106.1@50,3002.38 v1@50,3086 ; BR1.2@990.61,1594.02 BR1.2@988.87,1592.28 988.87,1630 cw(c1017.87,1630) 1017.87,1659 v1(1425.79,1659) BR2.2@1425.79,1592.28 ; Q6.3@1100,3150 v1(1100,3248.03) ; C97.1@1200,2241.41 v1(1200,2307.06) ; v1@1894.47,2964.84 Q4.3@1894.47,3104.45 ; BR3.2@2043.94,1592.28 v1(2043.94,1659) ; v1(2698.2,2960.9) Q2.3@2698.2,3104.45
  Bottom Layer w9: U6.9@4401.25,1040.91 4428.62,1040.91 cw(c4428.62,1021.22) U6.11@4448.3,1021.22 ; v1(4461.08,1021.22) U6.3@4495.35,1021.22
  Bottom Layer w10: v1(1765.07,3366.14) 1790.29,3366.14 ccw(c1790.29,3380.28) 1804.44,3380.28 C104.1@1804.44,3447.4 ; v1(2565.07,3366.14) 2588.55,3366.14 ccw(c2588.55,3382.03) 2604.44,3382.03 C95.1@2604.44,3447.4 ; v1(3365.07,3366.14) 3390.02,3366.14 ccw(c3390.02,3380.56) 3404.44,3380.56 C86.1@3404.44,3447.4 ; v1(4303.53,91.22) D7.1@4347.95,91.22 ; C60.1@4329.86,1040.91 U6.9@4387.25,1040.91 ; C59.1@4418.3,923.83 cw(c4418.3,915.13) 4427,915.13 4427,829 ; C57.1@4419.68,1177.59 C58.1@4478.68,1177.59 v1(4539.83,1177.59) ; v1(4583,1477.07) 4633.52,1477.07 C52.1@4636.72,1473.88 ; v1(4713.43,1715.2) C36.1@4743.6,1715.2 4743.6,1714.5 C44.2@4786.6,1714.5 ; C44.2@4786.87,1714.5 C44.2@4786.6,1714.5 ; C39.1@4957.97,1747.05 C37.2@4916.57,1747.05 4801.83,1747.05 ccw(c4801.83,1731.82) 4786.6,1731.82 C44.2@4786.6,1714.5 ; R71.2@5334,1041.89 v1(5399.5,1041.89) ; R72.2@5334,1160 v1(5399.5,1160)
  Bottom Layer w15: C60.1@4336.68,1048.09 4336.68,1154.27 cw(c4360,1154.27) 4360,1177.59 C57.1@4419.68,1177.59
  Bottom Layer w20: U7.1@3910,910 3910,800 ccw(c3940,800) 3940,770 C61.1@4010,770
  other v1: 4497.76,192 4545,192 4497.76,239.24 4545,239.24 4497.76,286.49 4545,286.49 4836.18,518.42 4836.18,544 5158,963.53 4448.3,991.69 4436.52,1021.22 4448.3,1050.75 4794.75,1476.28 4841.99,1476.28 4889.24,1476.28 4936.48,1476.28 4390,1497 4794.75,1518.52 4841.99,1518.52 4889.24,1518.52 4936.48,1518.52 5308.14,1536.95 5369.74,1536.95 5409.49,1552.59 4794.75,1565.76 4841.99,1565.76 4889.24,1565.76 4936.48,1565.76 4263,1592.6 4335,1592.6 4390,1592.6 4794.75,1608.01 4841.99,1608.01 4889.24,1608.01 4936.48,1608.01 5419.53,1624.28 5248.61,1628.3 5308.14,1628.3 5338,1659.29 5419.53,1659.29 5338,1694.3 5419.53,1694.3 5338,1731.6 5419.53,1731.6 4259.19,1822.99 5331.4,2093.84 5368.7,2093.84 5406,2093.84 4845.61,2150.13 1577.51,2503.24 1624.76,2503.24 1672,2503.24 4520.63,2845 1894.47,2960.9 50,3087 1639.12,3292.28 1668.73,3292.28 2439.12,3292.28 2468.73,3292.28 3239.12,3292.28 3268.73,3292.28 1639.12,3321.89 1668.73,3321.89 2439.12,3321.89 2468.73,3321.89 3239.12,3321.89 3268.73,3321.89 1510.12,3550.02 2310.12,3550.02 3110.12,3550.02
  other v2: 4406.76,2166.73
I2C_SCL: R56.2 R66.2 U10.7 U11.2 U12.14 U13.10 | length 4325.9
  Top Layer w7: U13.10@4367.34,2289.37 4367,2289.37 4367,2226.55 ccw(c4379.11,2226.55) 4379.11,2214.44 4514.32,2214.44 ccw(c4514.32,2227.12) 4527,2227.12 4527,2451 cw(c4557,2451) 4557,2481 5052,2481 ccw(c5052,2500) 5071,2500 U11.2@5071,2643.35 U12.14@5142.13,2643.35 ; v1(4590,1955.97) 4590,1915 cw(c4566.74,1915) 4566.74,1891.74 4482.85,1891.74 ccw(c4482.85,1871.9) 4463,1871.9 4463,1471.1 ccw(c4471.88,1471.1) 4471.88,1462.22 4497.65,1462.22 cw(c4497.65,1451.43) 4508.43,1451.43 4508.43,1164.51 cw(c4494.1,1164.51) 4494.1,1150.18 4400.47,1150.18 ccw(c4400.47,1138.4) 4388.69,1138.4 4388.69,537.18 ccw(c4405.41,537.18) 4405.41,520.46 U10.7@4797.05,520.46
  Top Layer w10: v1(4343,2289.37) U13.10@4367,2289.37
  Layer 2 w7: v1(4343,2289.37) 4554.65,2289.37 cw(c4554.65,2254.01) 4590,2254.01 v1(4590,1955.97)
  Bottom Layer w7: v1(4590,1955.97) 4590,1657.3 ccw(c4606.56,1657.3) 4606.56,1640.74 R56.2@4636.72,1640.74 R66.2@4636.72,1684.2
I2C_SDA: R55.2 R65.2 U10.8 U11.3 U12.13 U13.9 | length 4379.4
  Top Layer w7: v1(4446.08,2237.73) cw(c4445.35,2237.73) 4445.35,2237 4400.8,2237 cw(c4400.8,2250.78) 4387.02,2250.78 U13.9@4387.02,2289.37 4387.02,2480.52 cw(c4416.51,2480.52) 4416.51,2510 4913,2510 ccw(c4913,2525) 4928,2525 4928,2743 cw(c4948,2743) 4948,2763 5051,2763 cw(c5051,2743) 5071,2743 U11.3@5071,2718.15 5132.62,2718.15 cw(c5132.62,2708.25) 5142.52,2708.25 U12.13@5142.52,2683.11 ; v1(4560,1956.37) 4467.37,1956.37 ccw(c4467.37,1931) 4442,1931 4442,1455.38 ccw(c4456.03,1455.38) 4456.03,1441.35 4479.71,1441.35 cw(c4479.71,1431.39) 4489.67,1431.39 4489.67,1183.4 cw(c4473.19,1183.4) 4473.19,1166.92 4388.98,1166.92 ccw(c4388.98,1145.04) 4367.1,1145.04 4367.1,523.72 ccw(c4390.04,523.72) 4390.04,500.78 U10.8@4797.05,500.78
  Layer 2 w7: v1(4446.08,2237.73) 4539.06,2237.73 cw(c4539.06,2216.79) 4560,2216.79 v1(4560,1956.37)
  Bottom Layer w7: v1(4560,1956.37) 4560,1610 ccw(c4579.63,1610) 4579.63,1590.37 R55.2@4636.72,1590.37 R65.2@4636.72,1532.3
IA_N1: D2.1 D2.2 J2.7 R4.1 R5.1 | length 864.4
  Top Layer w15: J2.7@2556.1,14.82 2556.1,82.74 cw(c2580,82.74) 2580,106.64 2771.52,106.64 ccw(c2771.52,138.77) 2803.65,138.77 2803.65,278.44 cw(c2821.36,278.44) 2819.36,296.04 2839.12,297.16 D2.2@2847.77,297.65 D2.1@2922.57,297.65
  Top Layer w20: R4.1@2885.17,394.67 2901.07,394.67 2922.57,373.18 D2.1@2922.57,297.65
  Top Layer w30: R4.1@2887.58,394.67 2934.58,411.17 v1(2934.58,451.56)
  Bottom Layer w30: v1(2934.58,451.56) R5.1@2934.58,487.76
IA_P1: D1.1 D1.2 J2.6 R1.1 R3.2 | length 1022.9
  Top Layer w15: J2.6@2356.1,14.82 2356.1,106.64 cw(c2389.11,106.64) 2389.11,139.64 2734.22,139.64 ccw(c2734.22,173.47) 2768.04,173.47 2768.04,276.21 ccw(c2746.61,276.21) 2746.61,297.65 D1.1@2724.98,297.65 D1.2@2650.18,297.65
  Top Layer w20: D1.2@2650.18,297.65 2650.18,373.18 2671.67,394.67 R3.2@2687.58,394.67
  Top Layer w30: v1(2641.17,452.07) 2641.17,411.17 R3.2@2687.58,394.67
  Bottom Layer w30: v1(2641.17,452.07) R1.1@2641.17,488.28
IAN1: C4.1 R6.2 U1.8 | length 944.1
  Top Layer w10: v1(2892.36,901.65) 2892.36,1250.22 cw(c2906.44,1250.22) 2906.44,1264.29 2913.15,1264.29 U1.8@2982.03,1264.29
  Bottom Layer w10: C4.1@2846.17,629.42 2806.43,629.42 cw(c2806.43,642.31) 2793.54,642.31 2793.54,886.51 cw(c2808.68,886.51) 2808.68,901.65 v1@2897.36,901.65
  Bottom Layer w20: R6.2@2846.16,547.77 C4.1@2846.16,628.91
IAP1: C2.2 R2.2 U1.7 | length 987.5
  Top Layer w10: v1(2866.04,924.65) 2866.04,1268.69 cw(c2881.33,1268.69) 2881.33,1283.97 2891.06,1283.97 U1.7@2982.03,1283.97
  Bottom Layer w10: C2.2@2714.58,629.42 2729.58,629.42 2754.33,629.42 ccw(c2754.33,642.31) 2767.22,642.31 2767.22,904.73 cw(c2787.14,904.73) 2787.14,924.65 v1@2871.04,924.65
  Bottom Layer w20: R2.2@2729.58,548.28 C2.2@2729.58,629.42
IB_N1: D4.1 D4.2 J2.9 R12.1 R13.1 | length 864.2
  Top Layer w15: J2.9@2956.1,14.82 2956.1,93.56 cw(c2982.48,93.56) 2982.48,119.94 3172.73,119.94 ccw(c3172.73,151.69) 3204.48,151.69 3204.48,280.38 cw(c3221.74,280.38) 3221.74,297.64 D4.2@3250.17,297.64 D4.1@3324.97,297.64
  Top Layer w20: R12.1@3287.58,394.67 3303.48,394.67 3324.97,373.17 D4.1@3324.97,297.64
  Top Layer w30: R12.1@3287.58,394.67 3331.57,411.17 v1(3331.57,451.05)
  Bottom Layer w30: v1(3331.57,451.05) R13.1@3331.57,487.25
IB_P1: D3.1 D3.2 J2.8 R9.1 R11.2 | length 1028.2
  Top Layer w15: J2.8@2756.1,14.82 2836.8,14.82 ccw(c2836.8,34.13) 2856.1,34.13 2856.1,121.05 cw(c2885.05,121.05) 2885.05,150 3145.21,150 ccw(c3145.21,177.86) 3173.08,177.86 3173.08,278.78 ccw(c3154.16,278.73) 3154.16,297.65 3133.62,297.65 D3.1@3124.98,297.65 D3.2@3050.17,297.65
  Top Layer w20: D3.2@3050.17,297.65 3050.17,373.18 3071.67,394.67 R11.2@3087.58,394.67
  Top Layer w30: v1(3043.16,452.07) 3043.16,411.17 R11.2@3087.58,394.67
  Bottom Layer w30: v1(3043.16,452.07) R9.1@3043.16,488.27
IBN1: C8.1 R14.2 U1.10 | length 991.2
  Top Layer w10: v1(2950,924.65) 2950,1212.12 cw(c2962.8,1212.12) 2962.8,1224.92 U1.10@2982.03,1224.92
  Bottom Layer w10: v1(2950,924.65) 3179.6,924.65 cw(c3179.6,903.72) 3200.54,903.72 ; 3200.54,903.67 3200.54,642.94 ccw(c3213.43,642.94) 3213.43,630.05 C8.1@3253.17,630.05
  Bottom Layer w20: R14.2@3253.17,548.28 C8.1@3253.17,629.42
IBP1: C6.2 R10.2 U1.9 | length 1039.9
  Top Layer w10: v1(2923.68,901.65) 2923.68,1230.88 cw(c2937.4,1230.88) 2937.4,1244.6 U1.9@2982.03,1244.6
  Bottom Layer w10: v1(2923.68,901.65) 3160.44,901.65 cw(c3160.44,887.87) 3174.22,887.87 3174.22,642.94 cw(c3161.33,642.94) 3161.33,630.05 C6.2@3121.58,630.05
  Bottom Layer w20: R10.2@3121.58,548.28 C6.2@3121.58,629.42
IC_N1: D6.1 D6.2 J2.11 R18.1 R19.1 | length 865.4
  Top Layer w15: J2.11@3356.1,14.82 3356.1,93.56 cw(c3382.48,93.56) 3382.48,119.94 3575.75,119.94 ccw(c3575.75,148.67) 3604.48,148.67 3604.48,280.38 cw(c3621.74,280.38) 3621.74,297.64 D6.1@3724.97,297.65
  Top Layer w20: R18.1@3687.58,394.67 3703.48,394.67 3724.97,373.18 D6.1@3724.97,297.65
  Top Layer w30: R18.1@3687.58,394.67 3732.58,411.17 v1(3732.58,450)
  Bottom Layer w30: v1(3732.58,450) R19.1@3732.58,486.2
IC_P1: D5.1 D5.2 J2.10 R15.1 R17.2 | length 1027.7
  Top Layer w15: J2.10@3156.1,14.82 3236.8,14.82 ccw(c3236.8,34.13) 3256.1,34.13 3256.1,122.08 cw(c3284.02,122.08) 3284.02,150 3545.21,150 ccw(c3545.21,177.86) 3573.08,177.86 3573.08,278.78 ccw(c3554.16,278.73) 3554.16,297.65 3533.62,297.65 D5.1@3524.98,297.65 D5.2@3450.18,297.65
  Top Layer w20: D5.2@3450.18,297.65 3450.18,373.18 3471.67,394.67 R17.2@3487.58,394.67
  Top Layer w30: v1(3444.17,452.07) 3444.17,411.17 R17.2@3487.58,394.67
  Bottom Layer w30: v1(3444.17,452.07) R15.1@3444.17,488.28
ICN1: C14.1 R20.2 U1.12 | length 1259.6
  Top Layer w10: v1(3027.6,1011) U1.12@3027.6,1199.03
  Bottom Layer w10: v1(3027.6,1011) 3573,1011 cw(c3573,982.46) 3601.54,982.46 3601.54,642.31 ccw(c3614.43,642.31) 3614.43,629.42 C14.1@3654.17,629.42
  Bottom Layer w20: R20.2@3654.16,548.79 C14.1@3654.17,629.42 C14.1@3654.16,629.93
ICP1: C12.2 R16.2 U1.11 | length 1317.2
  Top Layer w10: v1(2976.32,985) 2976.32,1185.6 cw(c2989.76,1185.6) 2989.76,1199.03 U1.11@3007.92,1199.03
  Bottom Layer w10: v1(2976.32,985) 3551,985 cw(c3551,960.78) 3575.22,960.78 ; C12.2@3522.58,629.42 3562.33,629.42 ccw(c3562.33,642.31) 3575.22,642.31 3575.22,960.78 ; 3575.22,965.78 3575.22,960.78
  Bottom Layer w20: R16.2@3522.58,548.28 C12.2@3522.58,629.42
INN1: R25.1 U1.14 | length 217.2
  Top Layer w10: U1.14@3066.97,1199.03 3066.97,1102.44 ccw(c3079.41,1102.44) 3079.41,1090 3138.52,1090 cw(c3138.52,1078.62) 3149.9,1078.62 R25.1@3149.9,1054.5
INP1: R24.2 U1.13 | length 188.7
  Top Layer w10: U1.13@3047.29,1199.03 3047.29,1067.13 ccw(c3059.92,1067.13) 3059.92,1054.5 R24.2@3096.91,1054.5
IRQ0_1: LED3.2 U1.31 | length 415.7
  Top Layer w10: U1.31@3185.08,1427.97 v1(3185.08,1476) v1@3185.19,1476 ; LED3.2@3358.52,1566.75 LED3.2@3359.39,1567.62
  Top Layer w20: LED3.2@3361.31,1576.54 v1(3412.74,1576.54)
  Layer 2 w10: v1@3185.19,1476 3185.19,1545.75 cw(c3215.99,1545.75) 3215.99,1576.54 v1(3412.74,1576.54)
IRQ1_1: LED4.2 U1.32 | length 791.7
  Top Layer w10: v1(3145.71,1476) cw(c3145.71,1456.31) 3165.4,1456.31 U1.32@3165.4,1427.97 ; LED4.2@3358.52,1646.17 LED4.2@3359.4,1647.04
  Top Layer w20: LED4.2@3359.4,1647.04 v1(3413.17,1647.04)
  Layer 2 w10: v1(3145.71,1476) 3145.71,1426.81 ccw(c3159.88,1426.81) 3159.88,1412.64 3464.97,1412.64 ccw(c3464.97,1427.67) 3480,1427.67 3480,1626.17 ccw(c3460,1626.17) 3460,1646.17 3414.04,1646.17 cw(c3414.04,1647.04) v1(3413.17,1647.04)
L1_200_CT_1: C85.2 J5.1 | length 1116.5
  Top Layer w20: C85.2@3106.7,3162.95 v1(3106.7,3200)
  Bottom Layer w10: v1(3106.7,3200) 3628,3200 ccw(c3628,3224) 3652,3224 3652,3629.16 cw(c3671.63,3629.16) 3671.63,3648.79 J5.1@3756.1,3648.79
L1_200_CT_2: J5.2 R107.2 | length 985.6
  Top Layer w20: R107.2@3048.18,3162.95 v1(3048.18,3222.87)
  Bottom Layer w10: v1(3048.18,3222.87) 3537.2,3222.87 ccw(c3537.2,3241.78) 3556.1,3241.78 J5.2@3556.1,3648.79
L1_1000_CT_1: C80.2 J5.3 R100.2 | length 338.4
  Top Layer w20: R100.2@3287.01,3507.4 3287.01,3611.65 3287.01,3625.4 cw(c3308.52,3625.4) 3306.83,3646.85 J5.3@3356.1,3648.79
  Bottom Layer w10: C80.2@3287.01,3570.05 3287.01,3609.81 3287.02,3628.3 cw(c3307.51,3628.3) 3307.51,3648.79 J5.3@3356.1,3648.79
L1_1000_CT_2: C80.1 C81.2 C83.1 J5.4 U15.15 | length 675.6
  Top Layer w10: v1@3195.29,3401.74 3232.72,3401.74 cw(c3232.72,3390.3) 3244.17,3390.3 U15.15@3244.17,3366.03
  Top Layer w20: J5.4@3156.1,3648.79 3204.4,3646.97 cw(c3202.43,3620.85) 3228.63,3620.85 3228.63,3616.1 C83.1@3228.63,3507.39 C81.2@3169.68,3507.39
  Bottom Layer w10: J5.4@3156.1,3648.79 3206.52,3648.79 cw(c3206.52,3628.3) 3227.01,3628.3 C80.1@3227.01,3570.05 ; v1(3194.88,3401.74) 3214.79,3401.74 ccw(c3214.79,3414.01) 3227.06,3414.01 C80.1@3227.06,3570
L2_200_CT_1: C94.2 J5.5 | length 1116.5
  Top Layer w20: C94.2@2306.7,3162.95 v1(2306.7,3200)
  Bottom Layer w10: v1(2306.7,3200) 2828,3200 ccw(c2828,3224) 2852,3224 2852,3629.16 cw(c2871.63,3629.16) 2871.63,3648.79 J5.5@2956.1,3648.79
L2_200_CT_2: J5.6 R124.2 | length 985.6
  Top Layer w20: R124.2@2248.18,3162.95 v1(2248.18,3222.87)
  Bottom Layer w10: v1(2248.18,3222.87) 2737.2,3222.87 ccw(c2737.2,3241.78) 2756.1,3241.78 J5.6@2756.1,3648.79
L2_1000_CT_1: C89.2 J5.7 R117.2 | length 338.4
  Top Layer w20: R117.2@2487.01,3507.4 2487.01,3611.65 2487.01,3625.4 cw(c2508.52,3625.4) 2506.83,3646.85 J5.7@2556.1,3648.79
  Bottom Layer w10: C89.2@2487.01,3570.05 2487.01,3609.81 2487.02,3628.3 cw(c2507.51,3628.3) 2507.51,3648.79 J5.7@2556.1,3648.79
L2_1000_CT_2: C89.1 C90.2 C92.1 J5.8 U16.15 | length 675.6
  Top Layer w10: v1@2395.29,3401.74 2432.72,3401.74 cw(c2432.72,3390.3) 2444.17,3390.3 U16.15@2444.17,3366.03
  Top Layer w20: J5.8@2356.1,3648.79 2404.4,3646.97 cw(c2402.43,3620.85) 2428.63,3620.85 2428.63,3616.1 C92.1@2428.63,3507.39 C90.2@2369.68,3507.39
  Bottom Layer w10: J5.8@2356.1,3648.79 2406.52,3648.79 cw(c2406.52,3628.3) 2427.01,3628.3 C89.1@2427.01,3570.05 ; v1(2394.88,3401.74) 2414.79,3401.74 ccw(c2414.79,3414.01) 2427.06,3414.01 C89.1@2427.06,3570
L3_200_CT_1: C103.2 J5.9 | length 1116.5
  Top Layer w20: C103.2@1506.7,3162.95 v1(1506.7,3200)
  Bottom Layer w10: v1(1506.7,3200) 2028,3200 ccw(c2028,3224) 2052,3224 2052,3629.16 cw(c2071.63,3629.16) 2071.63,3648.79 J5.9@2156.1,3648.79
L3_200_CT_2: J5.10 R141.2 | length 985.6
  Top Layer w20: R141.2@1448.18,3162.95 v1(1448.18,3222.87)
  Bottom Layer w10: v1(1448.18,3222.87) 1937.2,3222.87 ccw(c1937.2,3241.78) 1956.1,3241.78 J5.10@1956.1,3648.79
L3_1000_CT_1: C98.2 J5.11 R134.2 | length 338.4
  Top Layer w20: R134.2@1687.01,3507.4 1687.01,3611.65 1687.01,3625.4 cw(c1708.52,3625.4) 1706.83,3646.85 J5.11@1756.1,3648.79
  Bottom Layer w10: C98.2@1687.01,3570.05 1687.01,3609.81 1687.02,3628.3 cw(c1707.51,3628.3) 1707.51,3648.79 J5.11@1756.1,3648.79
L3_1000_CT_2: C98.1 C99.2 C101.1 J5.12 U17.15 | length 675.6
  Top Layer w10: v1(1594.88,3401.74) 1632.3,3401.74 cw(c1632.3,3390.29) 1643.75,3390.29 U17.15@1643.75,3366.03
  Top Layer w20: J5.12@1556.1,3648.79 1604.4,3646.97 cw(c1602.43,3620.85) 1628.63,3620.85 1628.63,3616.1 C101.1@1628.63,3507.39 C99.2@1569.68,3507.39
  Bottom Layer w10: J5.12@1556.1,3648.79 1606.52,3648.79 cw(c1606.52,3628.3) 1627.01,3628.3 C98.1@1627.01,3570.05 ; v1(1594.88,3401.74) 1614.79,3401.74 ccw(c1614.79,3414.01) 1627.06,3414.01 C98.1@1627.06,3570
MISO: U1.38 U2.11 | length 1685.9
  Top Layer w10: v1(2968.94,1578.73) 3030.38,1578.73 cw(c3030.38,1561.82) 3047.29,1561.82 U1.38@3047.29,1427.97 ; v1@3755.56,1224.31 v1(3755.75,1224.5) ; U2.11@3755.75,1345.33 U2.11@3755.93,1345.51
  Top Layer w15: v1(3755.75,1224.5) U2.11@3755.75,1345.33
  Bottom Layer w10: v1@2971.63,1578.73 2881.19,1578.73 ccw(c2881.19,1557.54) 2860,1557.54 2860,1247.15 ccw(c2882.84,1247.15) 2882.84,1224.31 v1@3755.56,1224.31
MOSI: U1.39 U2.12 | length 1201.8
  Top Layer w10: v1(2968.94,1547.73) 3015.2,1547.73 cw(c3015.2,1535.33) 3027.6,1535.33 3027.6,1529.72 U1.39@3027.6,1427.97
  Top Layer w15: U2.12@3805.93,1345.51 v1(3805.93,1402.98)
  Bottom Layer w10: v1(2968.94,1547.73) 3781.36,1547.73 cw(c3781.36,1523.15) 3805.93,1523.15 v1(3805.93,1402.98)
NetANT1_1: ANT1.1 L4.2 | length 332.6
  Top Layer w10: L4.2@5308.14,1578.88 5355.88,1578.88 ccw(c5355.88,1607) 5384,1607 5384,1843.02 cw(c5387,1843.02) ANT1.1@5387,1846.02
NetBR1_1: BR1.1 R99.1 R102.1 R104.1 | length 1188.4
  Top Layer w30: v1(908.82,1838) 908.82,1527.44 ccw(c943.3,1527.44) 943.3,1492.97 1114.09,1492.97 ccw(c1114.09,1525.23) 1146.35,1525.23 BR1.1@1146.35,1592.28
  Bottom Layer w10: R99.1@720,1761.89 908.82,1761.89 ; 908.82,1850 v1(908.82,1838) 908.82,1761.89 ; R104.1@1146.35,1725.54 ccw(c1110,1725.54) R104.1@1110,1761.89 908.82,1761.89
  other v1: 867.37,1838 950.28,1838
NetBR1_3: BR1.3 R98.2 R101.2 R103.2 | length 1381.9
  Top Layer w60: R98.2@566.6,354.89 R101.2@566.6,727.12 R103.2@566.6,1099.36 566.6,1292.27 cw(c634.34,1292.27) 634.34,1360 BR1.3@972.42,1360
NetBR2_1: BR2.1 R116.1 R119.1 R121.1 | length 791.8
  Top Layer w10: R116.1@1582.48,1760 R116.1@1647.18,1760
  Top Layer w20: R119.1@1299.22,1760 1582.48,1760 v1(1582.48,1838)
  Top Layer w30: BR2.1@1583.27,1592.28 1583.27,1725.79 1617.48,1760 1647.18,1760 R116.1@1689.61,1760
  Bottom Layer w10: v1(1582.48,1838) 1582.48,1734.75 cw(c1593.46,1734.75) R121.1@1585.7,1742.52
  other v1: 1541.02,1838 1623.94,1838
NetBR2_4: BR2.4 R115.2 R118.2 R120.2 | length 959.5
  Top Layer w15: R118.2@1129.98,1153.17 R120.2@1505.15,1153.17 R115.2@1880.31,1153.17 ; BR2.4@1583.27,1360 1583.27,1163.82 ccw(c1591.51,1163.82) R120.2@1591.51,1155.58
NetBR3_1: BR3.1 R133.1 R136.1 R138.1 | length 757.3
  Top Layer w20: R136.1@2021.42,1720.79 2060.63,1760 R136.1@2080,1760 ; R136.1@2082,1760 v1@2082,1838
  Top Layer w30: BR3.1@2201.42,1592.28 R136.1@2201.42,1720.79
  Bottom Layer w10: R138.1@1890,1759.72 1890,1760 2082,1760 ; v1@2082,1838 2082,1760 ; R133.1@2280,1760 2085,1760 ; 2082,1760 2085,1760 ; 2082,1760 2082,1757 cw(c2085,1757) 2085,1760
  other v1: 2043.54,1838 2085,1838 2126.46,1838
NetBR3_4: BR3.4 R132.2 R135.2 R137.2 | length 1205.8
  Top Layer w60: 2218.28,1360 2377.72,1360 cw(c2377.72,1288.61) 2449.11,1288.61 R137.2@2449.11,1098.87 R135.2@2449.11,726.63 R132.2@2449.11,354.39
NetC1_2: C1.2 R1.2 R2.1 | length 187.4
  Bottom Layer w20: C1.2@2641.16,628.79 2641.17,618.79 2641.17,553.28 R1.2@2641.17,548.28 2648.67,543.28 2722.08,493.28 R2.1@2729.58,488.28
NetC3_1: C3.1 R5.2 R6.1 | length 187.4
  Bottom Layer w20: R6.1@2846.16,487.77 2853.66,492.77 2927.08,542.76 R5.2@2934.58,547.76 2934.58,552.76 2934.58,618.28 C3.1@2934.58,628.28
NetC5_2: C5.2 R9.2 R10.1 | length 184.1